# Altium PCB Power_vac.PcbDoc (part 2 of 5)
Units mm, origin at the board's own origin, x right, y up, seen from the top; angles counter-clockwise.
Board outline 180 x 212 mm, 4 copper layers (Top Layer, Int1 (GND), Int2 (PWR), Bottom Layer), stack 2.01 mm thick; 296 components, 149 nets, 798 pads, 522 vias.
Unrouted connection lines stored in the file: 1.
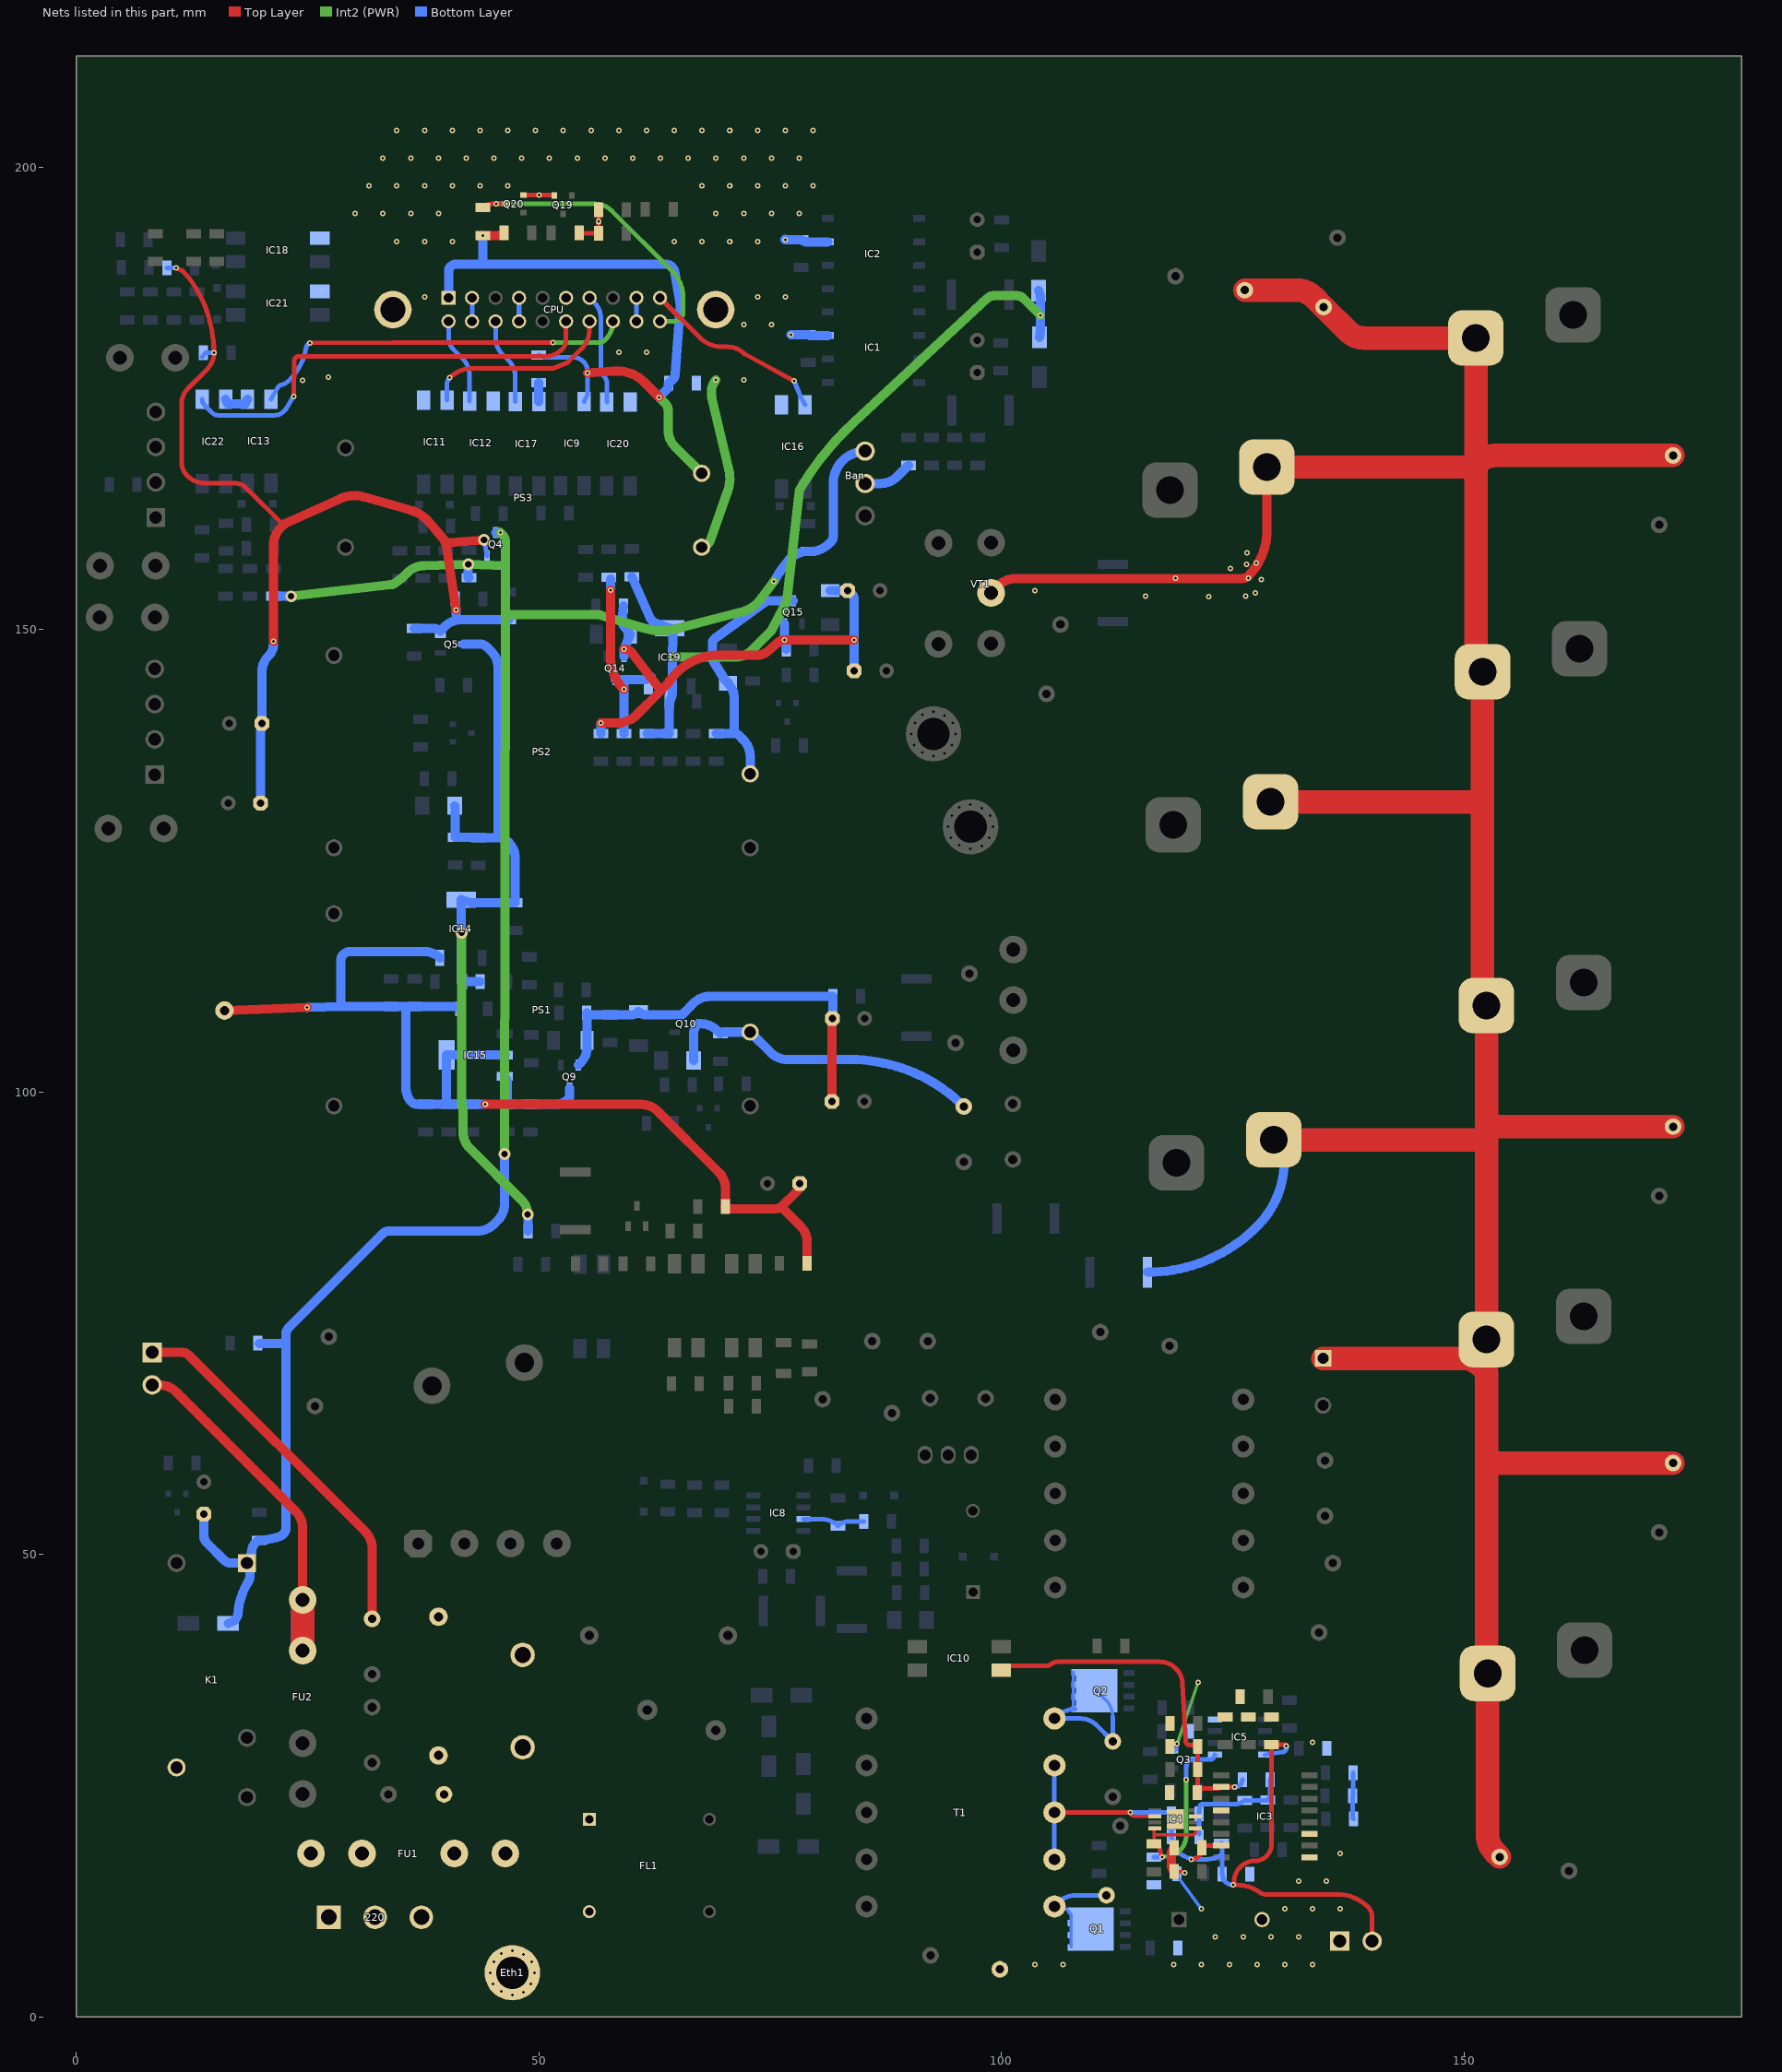
[diagram p4: the nets of this part, all layers, seen from the top]

## Footprints (in the part's own frame and the unit in brackets; to place one, negate y for a bottom-side part, rotate by r counter-clockwise, add the part's x,y. Pads: shape width x height; smd on the part's side, far side on the other; paste and mask are expansions set on the pad) (continued)
SOP65P490X110-9N [mm]
  rect 1.4x0.45 smd: 1(-2.2,0.975) 2(-2.2,0.325) 3(-2.2,-0.325) 4(-2.2,-0.975) 5(2.2,-0.975) 6(2.2,-0.325) 7(2.2,0.325) 8(2.2,0.975)
  rect 1.846x2.15 smd: 9(0,0)
  silkscreen extent -2.9,1.55 -1.5,1.55, body extent -2.45,-1.5 2.45,1.5, height 1.1
SOP254P1016X460-4N [mm]
  rect 2.1x1.45 smd: 1(-4.55,1.27) 2(-4.55,-1.27) 3(4.55,-1.27) 4(4.55,1.27)
  silkscreen extent -5.6,-2.3 3.15,2.34, body extent -5.08,-2.3 5.08,2.3, height 4.6
SOP254P1030X508-8N [mm]
  rect 1.3x0.75 smd: 1(-4.95,3.81) 2(-4.95,1.27) 3(-4.95,-1.27) 4(-4.95,-3.81) 5(4.95,-3.81) 6(4.95,-1.27) 7(4.95,1.27) 8(4.95,3.81)
  silkscreen extent -5.6,-4.83 3.95,4.83, body extent -5.15,-4.83 5.15,4.83, height 5.08
SOT95P230X110-3N [mm]
  rect 1.05x0.6 smd: 1(-1.1,0.95) 2(-1.1,-0.95) 3(1.1,0)
  silkscreen extent -1.63,-1.45 0.23,1.5, body extent -1.2,-1.45 1.2,1.45, height 0.95
SOT95P280X125-3N [mm]
  rect 1.2x0.6 smd: 1(-1.25,0.95) 2(-1.25,-0.95) 3(1.25,0)
  silkscreen extent -1.85,-1.48 0.3,1.5, body extent -1.4,-1.48 1.4,1.48, height 1.25
SOT230P700X180-4N [mm]
  rect 1.75x0.95 smd: 1(-3.15,2.3) 2(-3.15,0) 3(-3.15,-2.3)
  rect 1.75x3.2 smd: 4(3.15,0)
  silkscreen extent -4.03,-3.25 1.75,3.25, body extent -3.5,-3.25 3.5,3.25, height 1.8
THT_D_6mm_1#1 [mm]
  round 1.8 hole 1: 1(0,0) 2(6,0)
  silkscreen extent 1.5,-2 4.5,2
THT_D_6mm_1#2 [mm]
  round 3 hole 1.5: 1(0,0) 2(6,0)
  silkscreen extent 1.5,-2 4.5,2
THT_R_6mm_1 [mm]
  round 1.8 hole 0.9: 1(0,0) 2(6,0)
  silkscreen extent -2,-2 7.27,2
TO220 [mm]
  oval 1.6x2 hole 1.2: 1(-2.5,0) 2(0,0) 3(2.5,0)
  silkscreen extent -5.15,-1.95 5.25,2.8, body extent -5,-1.8 5.2,2.7, height 22.06
TO247 [mm] "3-Lead Plastic TO-247"
  round 3 hole 1.5: 1(-5.45,0) 2(0,0) 3(5.45,0)
  round 0.5 on Mech1: ""(-7.4,-2.3)
  silkscreen extent -8.1,-2.9 8.1,2.5, body extent -7.95,-2.75 7.95,2.35, height 26.95
TO247(D) [mm] "3-Lead Plastic TO-247"
  round 3 hole 1.5: 1(5.45,0) 2(-5.45,0)
  round 0.5 on Top Overlay: ""(-8.4,-2.3)
  round 0.5 on Mech1: ""(-7.5,-2.1)
  silkscreen extent -7.9,-2.5 8,2.8, body extent -7.95,-2.5 7.95,2.81, height 30.5
TO508P467X1023X1923-2P [mm]
  rect 1.8x1.8 hole 1.2: 1(0,0)
  round 1.8 hole 1.2: 2(5.08,0)
  silkscreen extent -2.64,-1.69 7.72,2.98, body extent -2.58,-1.69 7.66,2.98, height 19.23
UU105Y10MH [mm]
  rect 1.4x1.4 hole 0.9: 1(0,0)
  round 1.4 hole 0.9: 2(0,-10) 3(13,-10) 4(13,0)
  silkscreen extent -3.8,-12.5 16.25,7, body extent -3.25,-12.5 16.25,7, height 17.1
WJ2EDGR503P [mm]
  rect 2.55x2.55 hole 1.7: 1(0,0)
  round 2.55 hole 1.7: 2(5,0) 3(10,0)
  silkscreen extent -2.5,-10.7 12.5,2.1, body extent -2.5,-10.7 12.5,1.5, height 8.5

## Part data
220: "Connector", Manufacturer_Name="Ningbo Kangnex", Datasheet Link=https://datasheet.lcsc.com/lcsc/1912251636_Ningbo-Kangnex-Elec-WJ2EDGR-5-0-3P_C8480.pdf, Height=8.4mm, Manufacturer_Part_Number=WJ2EDGR-5.0-3P
+310_bridge Eth1 fod3184_+18v gnd_bridge: library part Connector_single_power, CommentText="\"Разъем\"", TypeConnector="Power connector", ValueManufacturerPartNumber="Power connector, *, *"
Ban: library part Connector_terminal_3pin, CurrentMax=10A, Manufacturer=Degson, PartNumber=DG350-3.5-03P-14, VoltageMax=300VAC, CommentText="\"Разъем\"", HelpURL=https://www.chipdip.ru/product/dg350-3.5-03p-12, Multichannel=3pin, Pitch=3.5mm, TypeConnector="Terminal connector", ValueManufacturerPartNumber="Terminal connector, 3pin, 3.5mm, 300VAC, 10A"
Buster_1 rele220_out: "Connector", Manufacturer_Name=Degson, Datasheet Link=https://www.tme.eu/Document/c7e2facf434c6541c93efde757aaf5e6/607.pdf, Height=7mm, Manufacturer_Part_Number=15EDGRC-3.5-02P-13-00AH
C1 C2 C3 C4 C5 C6 C7 C8 C50: library part Aluminium, Manufacturer=Wurth, Package="14x10x5 mm", PartNumber=860080475013, Temperature=-55...+105°C, Tolerance=±20%, TypeCapacitor="Aluminium capacitor", Voltage=450V, HelpURL=https://www.digikey.com/product-detail/en/wurth-electronics-inc/860080475013/732-9029-1-ND/5728972, Impedance=54mOhm
  C1 C2 C3 C4 C5 C6 C7 C8: ValueManufacturerPartNumber="Aluminium capacitor, 680μF, 450V, ±20%, 54mOhm, 14x10x5 mm, -55...+105°C"
  C50: ValueManufacturerPartNumber="Aluminium capacitor, 330μF, 450V, ±20%, 54mOhm, 14x10x5 mm, -55...+105°C"
C9 C10 C11 C12 C13 C14 C93: library part Film, Manufacturer=Epcos, Package="31.5x15 mm", PartNumber=B32774D4106K000, Temperature=-40...+105°C, Tolerance=±10%, TypeCapacitor="Film capacitor", Voltage=2kV, HelpURL=https://www.digikey.com/products/en/capacitors/film-capacitors/62?k=&pkeyword=&sv=0&pv2097=1958&sf=0&FV=fffc01ef%2C1f140000%2Cffe0003e%2Cffec6366&quantity=1&ColumnSort=1000011&page=1&stock=1&pageSize=25, Impedance=10.9mOhm
  C9 C10 C11 C12 C13 C14: ValueManufacturerPartNumber="Film capacitor, 1n, 2kV, ±10%, 10.9mOhm, 31.5x15 mm, -40...+105°C"
  C93: ValueManufacturerPartNumber="Film capacitor, 15p, 2kV, ±10%, 10.9mOhm, 31.5x15 mm, -40...+105°C"
C15 C18 C21 C23 C24 C25 C26 C27 C28 C29 C30 C31 C32 C33 C34 C35 C36 C37 C38 C39 C44 C45 C46 C47 C52 C53 C56 C57 C58 C59 C60 C61 C62 C63 C64 C65 C66 C67 C70 C71 C72 C73 C74 C75 C76 C79 C80 C81 C82 C83 C85 C86 C87 C88 C89 C91 C94 C95 C96 C97 C98 C99 C100 C101: library part Ceramic_1206, Manufacturer=Yageo, Package=1206, PartNumber=CC1206KRX7R9BB104, Temperature=-55...+125°C, Tolerance=±10%, TypeCapacitor="Ceramic capacitor", TypeDielectric=X7R, Voltage=50V, HelpURL=https://www.digikey.com/product-detail/en/yageo/CC1206KRX7R9BB104/311-1179-1-ND/303089
  C15 C45 C56 C60 C63 C67 C72 C76 C83 C85 C86 C91 C94 C95 C96 C97 C98 C99 C100 C101: ValueManufacturerPartNumber="Ceramic capacitor, 100n, X7R, ±10%, 50V, 1206, -55...+125°C"
  C18 C21 C24 C30 C31: ValueManufacturerPartNumber="Ceramic capacitor, 1μF, X7R, ±10%, 50V, 1206, -55...+125°C"
  C23 C44 C88: ValueManufacturerPartNumber="Ceramic capacitor, 2.2n, X7R, ±10%, 50V, 1206, -55...+125°C"
  C25 C27 C29 C33 C34 C36 C37 C52 C53 C61 C62 C70 C71 C79 C80 C81 C82: ValueManufacturerPartNumber="Ceramic capacitor, 0.1μF, X7R, ±10%, 50V, 1206, -55...+125°C"
  C26 C35 C57 C58 C59 C64 C65 C66 C73 C74 C75: ValueManufacturerPartNumber="Ceramic capacitor, 100μF, X7R, ±10%, 50V, 1206, -55...+125°C"
  C28 C38 C47: ValueManufacturerPartNumber="Ceramic capacitor, 1n, X7R, ±10%, 50V, 1206, -55...+125°C"
  C32: ValueManufacturerPartNumber="Ceramic capacitor, 2.2μF, X7R, ±10%, 50V, 1206, -55...+125°C"
  C39: ValueManufacturerPartNumber="Ceramic capacitor, 10n, X7R, ±10%, 50V, 1206, -55...+125°C"
  C46: ValueManufacturerPartNumber="Ceramic capacitor, 220n, X7R, ±10%, 50V, 1206, -55...+125°C"
  C87: ValueManufacturerPartNumber="Ceramic capacitor, 4.7u, X7R, ±10%, 50V, 1206, -55...+125°C"
  C89: ValueManufacturerPartNumber="Ceramic capacitor, 470p, X7R, ±10%, 50V, 1206, -55...+125°C"
C16: library part Ceramic_1206, Manufacturer=Yageo, Package=1206, PartNumber=CC1206KRX7R9BB104, Temperature=-55...+125°C, Tolerance=±10%, TypeCapacitor="Ceramic capacitor", TypeDielectric=X7R, Voltage=10v, HelpURL=https://www.digikey.com/product-detail/en/yageo/CC1206KRX7R9BB104/311-1179-1-ND/303089, ValueManufacturerPartNumber="Ceramic capacitor, 60u, X7R, ±10%, 10v, 1206, -55...+125°C"
C17 C20 C54 C55 C68 C69 C77 C78: library part Aluminium, Manufacturer=Wurth, Package="14x10x5 mm", PartNumber=860080475013, Temperature=-55...+105°C, Tolerance=±20%, TypeCapacitor="Aluminium capacitor", Voltage=25V, HelpURL=https://www.digikey.com/product-detail/en/wurth-electronics-inc/860080475013/732-9029-1-ND/5728972, Impedance=54mOhm
  C17 C20: ValueManufacturerPartNumber="Aluminium capacitor, 100u, 25V, ±20%, 54mOhm, 14x10x5 mm, -55...+105°C"
  C54 C55 C68 C69 C77 C78: ValueManufacturerPartNumber="Aluminium capacitor, 470μF, 25V, ±20%, 54mOhm, 14x10x5 mm, -55...+105°C"
C19 C22: library part Film, Manufacturer=Epcos, Package="31.5x15 mm", PartNumber=B32774D4106K000, Temperature=-40...+105°C, Tolerance=±10%, TypeCapacitor="Film capacitor", Voltage=2kv, HelpURL=https://www.digikey.com/products/en/capacitors/film-capacitors/62?k=&pkeyword=&sv=0&pv2097=1958&sf=0&FV=fffc01ef%2C1f140000%2Cffe0003e%2Cffec6366&quantity=1&ColumnSort=1000011&page=1&stock=1&pageSize=25, Impedance=10.9mOhm, ValueManufacturerPartNumber="Film capacitor, 1n, 2kv, ±10%, 10.9mOhm, 31.5x15 mm, -40...+105°C"
C40 C41 C51 C90 C92: library part Film, Manufacturer=Epcos, Package="31.5x15 mm", PartNumber=B32774D4106K000, Temperature=-40...+105°C, Tolerance=±10%, TypeCapacitor="Film capacitor", Voltage=450VDC, HelpURL=https://www.digikey.com/products/en/capacitors/film-capacitors/62?k=&pkeyword=&sv=0&pv2097=1958&sf=0&FV=fffc01ef%2C1f140000%2Cffe0003e%2Cffec6366&quantity=1&ColumnSort=1000011&page=1&stock=1&pageSize=25, Impedance=10.9mOhm
  C40: ValueManufacturerPartNumber="Film capacitor, 1n, 450VDC, ±10%, 10.9mOhm, 31.5x15 mm, -40...+105°C"
  C41: ValueManufacturerPartNumber="Film capacitor, 10n, 450VDC, ±10%, 10.9mOhm, 31.5x15 mm, -40...+105°C"
  C51: ValueManufacturerPartNumber="Film capacitor, 2.2n 1kv, 450VDC, ±10%, 10.9mOhm, 31.5x15 mm, -40...+105°C"
  C90 C92: ValueManufacturerPartNumber="Film capacitor, 2.2n, 450VDC, ±10%, 10.9mOhm, 31.5x15 mm, -40...+105°C"
C42: library part Aluminium, Manufacturer=Wurth, Package="14x10x5 mm", PartNumber=860080475013, Temperature=-55...+105°C, Tolerance=±20%, TypeCapacitor="Aluminium capacitor", Voltage=10v, HelpURL=https://www.digikey.com/product-detail/en/wurth-electronics-inc/860080475013/732-9029-1-ND/5728972, Impedance=54mOhm, ValueManufacturerPartNumber="Aluminium capacitor, 100μF, 10v, ±20%, 54mOhm, 14x10x5 mm, -55...+105°C"
C43: library part Aluminium, Manufacturer=Wurth, Package="14x10x5 mm", PartNumber=860080475013, Temperature=-55...+105°C, Tolerance=±20%, TypeCapacitor="Aluminium capacitor", Voltage=50v, HelpURL=https://www.digikey.com/product-detail/en/wurth-electronics-inc/860080475013/732-9029-1-ND/5728972, Impedance=54mOhm, ValueManufacturerPartNumber="Aluminium capacitor, 100μF, 50v, ±20%, 54mOhm, 14x10x5 mm, -55...+105°C"
C48 C49: library part Film, Manufacturer=Epcos, Package="31.5x15 mm", PartNumber=B32774D4106K000, Temperature=-40...+105°C, Tolerance=±10%, TypeCapacitor="Film capacitor", Voltage=310V, HelpURL=https://www.digikey.com/products/en/capacitors/film-capacitors/62?k=&pkeyword=&sv=0&pv2097=1958&sf=0&FV=fffc01ef%2C1f140000%2Cffe0003e%2Cffec6366&quantity=1&ColumnSort=1000011&page=1&stock=1&pageSize=25, Impedance=10.9mOhm, ValueManufacturerPartNumber="Film capacitor, 0.47, 310V, ±10%, 10.9mOhm, 31.5x15 mm, -40...+105°C"
C84: library part Aluminium, Manufacturer=Wurth, Package="14x10x5 mm", PartNumber=860080475013, Temperature=-55...+105°C, Tolerance=±20%, TypeCapacitor="Aluminium capacitor", Voltage=25v, HelpURL=https://www.digikey.com/product-detail/en/wurth-electronics-inc/860080475013/732-9029-1-ND/5728972, Impedance=54mOhm, ValueManufacturerPartNumber="Aluminium capacitor, 100μF, 25v, ±20%, 54mOhm, 14x10x5 mm, -55...+105°C"
CPU: "Connector", Manufacturer_Name=Connfly, Datasheet Link=https://www.tme.com/Document/a911e76bcf9b13f23ffda9abd299f5e3/DS1011.pdf, Height=8.7mm, Manufacturer_Part_Number=DS1011-20RBSIB7
D1 D2 D4 D5 D6 D7 D8: "Diode", Manufacturer_Name="SMC Diode Solutions", Datasheet Link=http://www.smc-diodes.com/propdf/ES1(A-M)%20N0159%20REV.E.pdf, Height=2.95mm, Manufacturer_Part_Number=ES1JTR
D3 D10 D13 D17 D22 D23 D24: library part THT_D_6mm_1
D9: "Diode", Manufacturer_Name=onsemi, Mouser Part Number=512-RHRP8120, Arrow Part Number=RHRP8120, Arrow Price/Stock=https://www.arrow.com/en/products/rhrp8120/on-semiconductor, Datasheet Link=https://www.onsemi.com/pub/Collateral/RHRP8120-D.PDF, Height=4.672mm, Manufacturer_Part_Number=RHRP8120, Mouser Price/Stock=https://www.mouser.co.uk/ProductDetail/onsemi-Fairchild/RHRP8120?qs=UeXq8qLVREGknIOnwE%2FlEA%3D%3D
D11 D12 D14 D16 D18 D19 D20 D21: "Diode", Manufacturer_Name=Vishay, Mouser Part Number=625-1N4148W-V, Arrow Part Number=1N4148W-V-GS08, Arrow Price/Stock=https://www.arrow.com/en/products/1n4148w-v-gs08/vishay, Datasheet Link=https://us.rs-online.com/m/d/a2789c8794cb0c42ced29f2dd8571f3c.pdf, Height=1.35mm, Manufacturer_Part_Number=1N4148W-V-GS08, Mouser Price/Stock=https://www.mouser.co.uk/ProductDetail/Vishay-Semiconductors/1N4148W-V-GS08?qs=TNTIDjy6APrS%2Fdgq1RSs3A%3D%3D
D15: "Diode", Manufacturer_Name=Nexperia, Datasheet Link=https://assets.nexperia.com/documents/data-sheet/BZV55_SER.pdf, Height=1.6mm, Manufacturer_Part_Number=BZV55B3V3
FL1: "Filter", Manufacturer_Name="FH(Guangdong Fenghua Advanced Tech)", Datasheet Link=https://datasheet.lcsc.com/lcsc/2304140030_FH--Guangdong-Fenghua-Advanced-Tech-UU10-5Y-10mH_C75196.pdf, Height=17mm, Manufacturer_Part_Number=UU10.5Y-10MH
FU1 FU2: library part Fuse, Manufacturer=Littelfuse, MaxCurrent=3A, Package=5x20mm, PartNumber=01110501Z, VoltageMax=250VAC, HelpURL=https://www.digikey.com/products/en?keywords=01110501Z, TypeFuse="Electromechanics relay", ValueManufacturerPartNumber="Electromechanics relay, 250VAC, 3A, 5x20mm,"
IC1 IC2: "Integrated Circuit", Manufacturer_Name=onsemi, Mouser Part Number=512-FOD3184SDV, Arrow Part Number=FOD3184SDV, Arrow Price/Stock=https://www.arrow.com/en/products/fod3184sdv/on-semiconductor?region=nac, Datasheet Link=https://www.arrow.com/en/products/fod3184sdv/on-semiconductor, Height=5.08mm, Manufacturer_Part_Number=FOD3184SDV, Mouser Price/Stock=https://www.mouser.co.uk/ProductDetail/onsemi-Fairchild/FOD3184SDV?qs=GCVmsggAYMRSO6%252BIR7fWEw%3D%3D
IC3: "Integrated Circuit", Manufacturer_Name=onsemi, Mouser Part Number=N/A, Datasheet Link=https://www.onsemi.com/pub/Collateral/SG3525A-D.PDF, Height=2.65mm, Manufacturer_Part_Number=SG3525A, Mouser Price/Stock=https://www.mouser.co.uk/ProductDetail/onsemi/SG3525A?qs=%252BEew9%252B0nqrDSSy3t2TCw8g%3D%3D
IC4: "Integrated Circuit", Manufacturer_Name="Texas Instruments", Mouser Part Number=595-CC27524A1QDGNRQ1, Arrow Part Number=UCC27524A1QDGNRQ1, Arrow Price/Stock=https://www.arrow.com/en/products/ucc27524a1qdgnrq1/texas-instruments.html?utm_currency=USD&region=nac, Datasheet Link=http://www.ti.com/lit/gpn/ucc27524a1-q1, Height=1.1mm, Manufacturer_Part_Number=UCC27524A1QDGNRQ1, Mouser Price/Stock=https://www.mouser.co.uk/ProductDetail/Texas-Instruments/UCC27524A1QDGNRQ1?qs=5aG0NVq1C4zKCNInVyVkfw%3D%3D
IC5: "Integrated Circuit", Manufacturer_Name="Texas Instruments", Mouser Part Number=595-LM2903DR, Arrow Part Number=LM2903DR, Arrow Price/Stock=https://www.arrow.com/en/products/lm2903dr/texas-instruments?region=nac, Datasheet Link=http://www.ti.com/lit/ds/symlink/lm393.pdf, Height=1.75mm, Manufacturer_Part_Number=LM2903DR, Mouser Price/Stock=https://www.mouser.co.uk/ProductDetail/Texas-Instruments/LM2903DR?qs=6aLkNDRfRUZTZwd6enMTiA%3D%3D
IC6 IC9 IC10 IC11 IC12 IC13 IC16 IC17 IC18 IC20 IC21 IC22 IC23 IC24: "Integrated Circuit", Manufacturer_Name=Lite-On, Arrow Part Number=LTV817S, Arrow Price/Stock=https://www.arrow.com/en/products/ltv-817s/lite-on-technology, Datasheet Link=https://www.arrow.com/en/products/ltv-817s/lite-on-technology, Height=4.6mm, Manufacturer_Part_Number=LTV817S
IC7: "Integrated Circuit", Manufacturer_Name=Nexperia, Mouser Part Number=771-TL431MFDT215, Arrow Part Number=TL431MFDT,215, Arrow Price/Stock=https://www.arrow.com/en/products/tl431mfdt215/nexperia?utm_currency=USD&region=nac, Datasheet Link=https://assets.nexperia.com/documents/data-sheet/TL431_FAM.pdf, Height=1.1mm, Manufacturer_Part_Number=TL431MFDT,215, Mouser Price/Stock=https://www.mouser.co.uk/ProductDetail/Nexperia/TL431MFDT215?qs=A1cBxND5mHKvFzVl3lBdcQ%3D%3D
IC8: "Integrated Circuit", Manufacturer_Name=STMicroelectronics, Mouser Part Number=511-L6565D, Arrow Part Number=L6565D, Arrow Price/Stock=https://www.arrow.com/en/products/l6565d/stmicroelectronics, Datasheet Link=https://www.st.com/resource/en/datasheet/l6565.pdf, Height=1.75mm, Manufacturer_Part_Number=L6565D, Mouser Price/Stock=https://www.mouser.co.uk/ProductDetail/STMicroelectronics/L6565D/?qs=sps7W%2FwBcGGH47tz0cin9g%3D%3D
IC14 IC15 IC19: "Integrated Circuit", Manufacturer_Name="Changjiang Electronics Tech (CJ)", Manufacturer_Part_Number=LM317(SOT-223), Datasheet Link=https://www.jscj-elec.com/gallery//file/LM317%20SOT-223%20%20V2.0.pdf, Height=1.8mm
K1: library part HF118F_005-1ZS1T_136_, "Relay or Contactor", Manufacturer_Name=Hongfa, Manufacturer_Part_Number=HF118F/005-1ZS1T(136), Height=12.8mm
on-off1 switch_vak1: "Connector", Manufacturer_Name=Degson, Manufacturer_Part_Number=15EDGRC-3.81-04P-14-00A(H), Datasheet Link=https://datasheet.octopart.com/15EDGRC-3.81-04P-14-00A%28H%29-Degson-datasheet-17801160.pdf, Height=7.54mm
PS1 PS2: "Power Supply", Manufacturer_Name="Mean Well", Mouser Part Number=709-IRM15-24, Arrow Part Number=IRM-15-24, Arrow Price/Stock=https://www.arrow.com/en/products/irm-15-24/mean-well-enterprises?utm_currency=USD&region=europe, Datasheet Link=https://componentsearchengine.com/Datasheets/2/IRM-15-24.pdf, Manufacturer_Part_Number=IRM-15-24, Mouser Price/Stock=https://www.mouser.co.uk/ProductDetail/MEAN-WELL/IRM-15-24?qs=WkdRfq4wf1PZSEWhZtKDbQ%3D%3D
PS3: "Power Supply", Manufacturer_Name="Mean Well", Mouser Part Number=709-IRM10-3.3, Arrow Part Number=IRM-10-3.3, Arrow Price/Stock=https://www.arrow.com/en/products/irm-10-3.3/mean-well-enterprises?region=nac, Datasheet Link=https://datasheet.datasheetarchive.com/originals/distributors/DKDS-14/277831.pdf, Height=21.5mm, Manufacturer_Part_Number=IRM-10-3.3, Mouser Price/Stock=https://www.mouser.co.uk/ProductDetail/MEAN-WELL/IRM-10-3.3?qs=WkdRfq4wf1M%252Ba4IjD903Hw%3D%3D
Q1 Q2: "MOSFET (N-Channel)", Manufacturer_Name=Infineon, Mouser Part Number=726-BSC123N08NS3GATM, Arrow Part Number=BSC123N08NS3GATMA1, Arrow Price/Stock=https://www.arrow.com/en/products/bsc123n08ns3gatma1/infineon-technologies-ag.html?utm_currency=USD&region=asia, Datasheet Link=https://www.infineon.com/dgdl/Infineon-BSC123N08NS3G-DS-v02_05-en.pdf?fileId=db3a30431add1d95011ae80eb8555625, Manufacturer_Part_Number=BSC123N08NS3GATMA1, Mouser Price/Stock=https://www.mouser.co.uk/ProductDetail/Infineon-Technologies/BSC123N08NS3GATMA1?qs=K00xGehIljtQ0xUH5qROpA%3D%3D
Q3 Q7 Q12 Q16 Q18: "Transistor BJT NPN", Manufacturer_Name=Nexperia, Mouser Part Number=771-BC817-25-T/R, Arrow Part Number=BC817-25,215, Arrow Price/Stock=https://www.arrow.com/en/products/bc817-25215/nexperia?region=nac, Datasheet Link=https://assets.nexperia.com/documents/data-sheet/BC817_SER.pdf, Height=1.1mm, Manufacturer_Part_Number=BC817-25,215, Mouser Price/Stock=https://www.mouser.co.uk/ProductDetail/Nexperia/BC817-25215?qs=me8TqzrmIYUj67JkTBzlfg%3D%3D
Q4 Q5 Q9 Q10 Q14 Q15: library part AO3401A, "MOSFET (P-Channel)", Manufacturer_Name="Alpha & Omega Semiconductors", Arrow Part Number=AO3401A, Arrow Price/Stock=https://www.arrow.com/en/products/ao3401a/alpha-and-omega-semiconductor?utm_currency=USD&region=nac, Datasheet Link=http://www.aosmd.com/pdfs/datasheet/AO3401A.pdf, Height=1.25mm, Manufacturer_Part_Number=AO3401A
Q19 Q20: library part BC817-25,215_1, "Transistor BJT NPN", Manufacturer_Name=Nexperia, Mouser Part Number=771-BC817-25-T/R, Arrow Part Number=BC817-25,215, Arrow Price/Stock=https://www.arrow.com/en/products/bc817-25215/nexperia?region=nac, Datasheet Link=https://assets.nexperia.com/documents/data-sheet/BC817_SER.pdf, Height=1.1mm, Manufacturer_Part_Number=BC817-25,215, Mouser Price/Stock=https://www.mouser.co.uk/ProductDetail/Nexperia/BC817-25215?qs=me8TqzrmIYUj67JkTBzlfg%3D%3D
R1 R3 R5 R7: library part Resistor_2512, Manufacturer=Yageo, Package=2512, PartNumber=RC2512JK-07100RL, Power=1W, Temperature=-55...+125°C, Tolerance=±5%, TypeResistor="Resistor film", HelpURL=https://www.digikey.com/product-detail/en/yageo/RC2512JK-07100RL/YAG3393CT-ND/5962215
  R1 R5: ValueManufacturerPartNumber="Resistor film, 15, ±5%, 2512, 1W, -55...+125°C"
  R3 R7: ValueManufacturerPartNumber="Resistor film, 1k, ±5%, 2512, 1W, -55...+125°C"
R2 R6 R8 R9 R10 R11 R12 R14 R15 R16 R17 R18 R19 R20 R21 R22 R23 R24 R29 R30 R31 R32 R34 R35 R37 R38 R39 R40 R44 R47 R48 R49 R50 R51 R52 R53 R54 R55 R56 R57 R58 R59 R60 R61 R62 R63 R64 R65 R66 R67 R68 R69 R70 R71 R72 R73 R74 R75 R76 R77 R78 R79 R80 R81 R82 R83 R84 R85 R86 R87 R88 R89 R90 R91 R92 R93 R94 R95 R97 R98: library part Resistor_1206, Manufacturer=Yageo, Package=1206, PartNumber=RC1206JR-07100RL, Power=0.25W, Temperature=-55...+125°C, Tolerance=±5%, TypeResistor="Resistor film", HelpURL=https://www.digikey.com/product-detail/en/yageo/RC1206JR-07100RL/311-100ERCT-ND/732153
  R2 R6 R23 R32 R44 R52 R86 R91 R97: ValueManufacturerPartNumber="Resistor film, 1k, ±5%, 1206, 0.25W, -55...+125°C"
  R8 R10 R11 R16 R18 R22 R24 R39 R49 R53 R54 R60 R66 R67 R70 R71 R75 R78 R81 R83 R84 R87 R92 R93 R94 R98: ValueManufacturerPartNumber="Resistor film, 10k, ±5%, 1206, 0.25W, -55...+125°C"
  R9 R12 R14 R38: ValueManufacturerPartNumber="Resistor film, 10, ±5%, 1206, 0.25W, -55...+125°C"
  R15 R31: ValueManufacturerPartNumber="Resistor film, 47, ±5%, 1206, 0.25W, -55...+125°C"
  R17: ValueManufacturerPartNumber="Resistor film, 6.8k, ±5%, 1206, 0.25W, -55...+125°C"
  R19: ValueManufacturerPartNumber="Resistor film, 22k, ±5%, 1206, 0.25W, -55...+125°C"
  R20: ValueManufacturerPartNumber="Resistor film, 30k, ±5%, 1206, 0.25W, -55...+125°C"
  R21: ValueManufacturerPartNumber="Resistor film, 100, ±5%, 1206, 0.25W, -55...+125°C"
  R29: ValueManufacturerPartNumber="Resistor film, 47k, ±5%, 1206, 0.25W, -55...+125°C"
  R30 R89: ValueManufacturerPartNumber="Resistor film, 1.2k, ±5%, 1206, 0.25W, -55...+125°C"
  R34: ValueManufacturerPartNumber="Resistor film, 220k, ±5%, 1206, 0.25W, -55...+125°C"
  R35: ValueManufacturerPartNumber="Resistor film, 100R, ±5%, 1206, 0.25W, -55...+125°C"
  R37: ValueManufacturerPartNumber="Resistor film, 3M, ±5%, 1206, 0.25W, -55...+125°C"
  R40: ValueManufacturerPartNumber="Resistor film, 16k, ±5%, 1206, 0.25W, -55...+125°C"
  R47 R50 R65 R68 R77 R79 R95: ValueManufacturerPartNumber="Resistor film, 100k, ±5%, 1206, 0.25W, -55...+125°C"
  R48 R56 R63 R72 R82: ValueManufacturerPartNumber="Resistor film, 470, ±5%, 1206, 0.25W, -55...+125°C"
  R51 R69 R80: ValueManufacturerPartNumber="Resistor film, 2k, ±5%, 1206, 0.25W, -55...+125°C"
  R55 R59 R64 R76 R85: ValueManufacturerPartNumber="Resistor film, 620, ±5%, 1206, 0.25W, -55...+125°C"
  R57 R61 R73: ValueManufacturerPartNumber="Resistor film, 3.3k, ±5%, 1206, 0.25W, -55...+125°C"
  R58 R62 R74: ValueManufacturerPartNumber="Resistor film, 240, ±5%, 1206, 0.25W, -55...+125°C"
  R88 R90: ValueManufacturerPartNumber="Resistor film, 4.7k, ±5%, 1206, 0.25W, -55...+125°C"
R4 R25 R26 R43 R45 R96: library part THT_R_6mm_1
R13: library part BPR58CR10J, "No Description Available", Manufacturer_Name="KOA Speer", Copyright="Copyright (C) 2026 Ultra Librarian. All rights reserved.", Manufacturer_Part_Number=BPR58CR10J, Type="Through Hole Resistors"
R27 R28 R33 R36 R41: library part Resistor_2512, Manufacturer=Yageo, Package=2512, PartNumber=RC2512JK-07100RL, Power=1W, Temperature=-55...+125°C, TypeResistor="Resistor film", HelpURL=https://www.digikey.com/product-detail/en/yageo/RC2512JK-07100RL/YAG3393CT-ND/5962215, Tolerance=2512
  R27 R28: ValueManufacturerPartNumber="Resistor film, 75k, 2512, 2512, 1W, -55...+125°C"
  R33 R36: ValueManufacturerPartNumber="Resistor film, 150k, 2512, 2512, 1W, -55...+125°C"
  R41: ValueManufacturerPartNumber="Resistor film, 2.43k, 2512, 2512, 1W, -55...+125°C"
R42: library part BPR58CR10J, "Resistor", Manufacturer_Name="KOA Speer", Mouser Part Number=660-BPR58CR10J, Arrow Part Number=BPR58CR10J, Arrow Price/Stock=https://www.arrow.com/en/products/bpr58cr10j/koa-speer-electronics.html?utm_currency=USD&region=nac, Datasheet Link=https://www.koaspeer.com/catimages/Products/BPR/BPR.pdf, Height=19mm, Manufacturer_Part_Number=BPR58CR10J, Mouser Price/Stock=https://www.mouser.co.uk/ProductDetail/KOA-Speer/BPR58CR10J?qs=c3C3yipULq1EyCkbnj3nTQ%3D%3D
R46: library part NTC, Manufacturer=Epcos, MaxCurrent=7A, Package="pitch 7.5mm", PartNumber=B57237S229M54, Temperature=-55...+125°C, Tolerance=±20%, TypeResistor="NTC resistor", HelpURL=https://www.digikey.com/product-detail/en/epcos-tdk/B57237S229M54/495-76635-1-ND/8126375, ValueManufacturerPartNumber="NTC resistor, NTC 10, ±20%, pitch 7.5mm, 7A, -55...+125°C"
RV1: "Varistor", Manufacturer_Name=Bourns, Mouser Part Number=652-MOV-20D431K, Arrow Part Number=MOV-20D431K, Arrow Price/Stock=https://www.arrow.com/en/products/mov-20d431k/bourns?utm_currency=USD&region=nac, Datasheet Link=https://www.bourns.com/data/global/pdfs/MOV20D.pdf, Height=26mm, Manufacturer_Part_Number=MOV-20D431K, Mouser Price/Stock=https://www.mouser.co.uk/ProductDetail/Bourns/MOV-20D431K?qs=CQ3B1E%252BbPs2R73OUL4kc5g%3D%3D
VD1: library part Diode_single, Current=150mA, Manufacturer="Micro Commercial", Package=SOD-323, PartNumber=HEA08, Temperature=-55...+150°C, Voltage=75V, VoltageDrop=1V, HelpURL=https://www.digikey.com/product-detail/en/micro-commercial-co/1N4148WX-TP/1N4148WXTPMSCT-ND/717312, RecoveryTime=4ns, TypeDiode="Single diode", ValueManufacturerPartNumber="Single diode, 75V, 150mA, 1V, 4ns, SOD-323, -55...+150°C"
VD2: library part "1PH rectifier", Current=2A, Manufacturer="Comchip Technology", Package=4-SMD, PartNumber=RS207, Temperature=-55...+150°C, Voltage=600V, VoltageDrop=1.1V, HelpURL=https://www.digikey.com/product-detail/en/comchip-technology/DF206ST-G/641-1425-1-ND/2208797, TypeDiode="Single phase rectifier", ValueManufacturerPartNumber="Single phase rectifier, 600V, 2A, 1.1V, 4-SMD, -55...+150°C"
VT1 VT2: library part IGBT, CurrentCE=40A, Manufacturer="Rohm Semiconductor", MaxPower=144W, Package=TO247, PartNumber=RGTH40TS65GC11, Temperature=-55...+125°C, VoltageCE=650V, VoltageSaturation=2.1V, GateCharge=40nC, HelpURL=https://www.digikey.com/product-detail/en/rohm-semiconductor/RGTH40TS65GC11/RGTH40TS65GC11-ND/5029953, TimeOnOff=22ns/73ns, TypeTransistor="IGBT transistor", ValueManufacturerPartNumber="IGBT transistor, 650V, 40A, 40nC, 144W, 2.1V, 22ns/73ns, TO247, -55...+125°C"
VT3: library part MOSFET_N_123, CurrentDS=7A, InputCapacitor=756pF, Manufacturer="Infineon Technologies", MaxPower=2.5W, Package=8-TDSON, PartNumber=STP7NB80FI, Temperature=-55...+150°C, VoltageDS=80V, GateCharge=9.1nC, HelpURL=https://www.digikey.com/product-detail/en/infineon-technologies/BSC340N08NS3GATMA1/BSC340N08NS3GATMA1TR-ND/2080655, RDS=34mOhm, TypeTransistor="MOSFET N-channel transistor", ValueManufacturerPartNumber="MOSFET N-channel transistor, 80V, 7A, 9.1nC, 2.5W, 34mOhm, 756pF, 8-TDSON, -55...+150°C"
Z1 Z8: library part BZV55C18, "Zener Diode", Manufacturer_Name=Microchip, Mouser Part Number=494-BZV55C18, Arrow Part Number=BZV55C18, Arrow Price/Stock=https://www.arrow.com/en/products/bzv55c18/microchip-technology.html?utm_currency=USD&region=nac, Datasheet Link=https://www.microsemi.com/document-portal/doc_download/8298-bzv55-c2v4-c75-datasheet, Height=1.7mm, Manufacturer_Part_Number=BZV55C18, Mouser Price/Stock=https://www.mouser.co.uk/ProductDetail/Microchip-Technology/BZV55C18?qs=w%2Fv1CP2dgqosS2q5rh%252BhPQ%3D%3D
Z2 Z3 Z4 Z5: "Zener Diode", Manufacturer_Name="Microsemi Corporation", Mouser Part Number=494-BZV55C15, Arrow Part Number=BZV55C15, Arrow Price/Stock=https://www.arrow.com/en/products/bzv55c15/microsemi, Datasheet Link=https://www.mouser.com/datasheet/2/268/BZV55_C2V4_C75-1593780.pdf, Manufacturer_Part_Number=BZV55C15, Mouser Price/Stock=https://www.mouser.co.uk/ProductDetail/Microchip-Microsemi/BZV55C15/?qs=TXMzd3F6Eykee5C9dglsnA%3D%3D
Z6 Z7: "Zener Diode", Manufacturer_Name=Microchip, Mouser Part Number=494-BZV55C18, Arrow Part Number=BZV55C18, Arrow Price/Stock=https://www.arrow.com/en/products/bzv55c18/microchip-technology.html?utm_currency=USD&region=nac, Datasheet Link=https://www.microsemi.com/document-portal/doc_download/8298-bzv55-c2v4-c75-datasheet, Height=1.7mm, Manufacturer_Part_Number=BZV55C18, Mouser Price/Stock=https://www.mouser.co.uk/ProductDetail/Microchip-Technology/BZV55C18?qs=w%2Fv1CP2dgqosS2q5rh%252BhPQ%3D%3D

## Via types
v1: diameter 0.6/0.6/0.6/0.6 (per signal layer), hole 0.3, Top Layer to Bottom Layer, tented both sides, 277 vias
v2: diameter 0.6, hole 0.3, Top Layer to Bottom Layer, tented both sides, 239 vias
v3: diameter 1.27, hole 0.711, Top Layer to Bottom Layer, 6 vias

## Nets (pads, with @x,y where several pads share a name; then routed paths per layer and width w, separated by ;. In a path a pad name is that pad's centre, name@x,y a point inside that pad or via, vN(x,y) a via of type N, cw(c..) or ccw(c..) an arc to the next point about the centre after c; other vN are vias at no path point)
3.3v_digit: C16.2 C85.2 CPU.1 IC9.4 PS3.3 R93.2 R94.2 | length 76.1
  Top Layer w1: v2(43.925,192.625) 45.561,192.625 ccw(c45.561,193.564) R93.2@46.225,192.9 ; v2(55.25,177.75) 57.895,177.947 cw(c57.969,176.95) 57.963,177.95 57.966,177.95 58.523,177.95 cw(c58.522,173.959) 61.344,176.781 61.347,176.778 v2@62.988,175.138
  Int2 (PWR) w1: v2(62.975,175.125) 63.658,174.442 cw(c62.95,173.736) 63.95,173.736 63.95,171.577 ccw(c66.49,171.577) 64.694,169.781 PS3.3@67.575,166.9
  Bottom Layer w0.5: C16.2@49.975,179.7 50.525,179.45 53.653,179.45 cw(c53.653,177.828) 54.8,178.975 cw(c53.714,177.889) 55.25,177.889 v2(55.25,177.75) 55.25,175.475 IC9.4@54.881,174.675
  Bottom Layer w1: CPU.1@40.22,185.875 40.22,188.975 cw(c41.114,188.527) 41.051,189.525 43.925,189.525 63.671,189.525 cw(c63.671,188.525) 64.594,188.91 cw(c63.671,188.525) 64.657,188.693 65.248,185.225 ; 43.925,189.646 v2(43.925,192.625) ; v2(62.975,175.125) 63.975,176.125 63.975,176.529 cw(c64.146,176.529) C85.2@64.025,176.65 64.393,176.969 ccw(c63.739,177.725) 64.736,177.652 65.26,184.986 ccw(c64.262,185.057) 65.262,185.057 ccw(c64.262,185.057) 65.248,185.224
12v: C53.2 C56.2 C57.2 C58.2 IC14.2 IC14.4 Q5.3 R58.2 R97.2 Z8.1 | length 91.5
  Int2 (PWR) w1: v3(41.625,117.2) 41.625,98.612 ccw(c42.137,98.612) 41.775,98.25 41.775,95.702 ccw(c44.315,95.702) 42.519,93.906 48.139,88.286 cw(c46.602,86.75) v3(48.775,86.75)
  Bottom Layer w1: Z8.1@40.875,130.95 cw(c40.695,130.77) 40.95,130.77 C53.2@40.95,127.55 43.329,127.55 cw(c43.329,127.379) C56.2@43.45,127.5 45.553,127.5 ; Q5.3@41.825,148.425 43.636,148.425 cw(c43.636,147.425) 44.342,148.133 44.88,147.595 cw(c43.255,145.97) 45.553,145.971 45.553,145.967 45.553,127.5 ; C57.2@43.626,111.925 41.6,111.925 41.6,114.44 ccw(c41.515,114.44) IC14.2@41.575,114.5 IC14.4@41.575,120.8 42.675,120.475 R58.2@47.425,120.475 47.425,125.275 ccw(c44.95,125.275) 46.7,127.025 ccw(c45.553,125.878) 45.553,127.5 ; v3(48.775,86.75) cw(c48.654,86.629) 48.825,86.629 R97.2@48.825,84.95
12v_akum: Buster_1.2 C26.1 C27.1 C29.1 C30.1 C37.1 IC3.15 IC4.6 IC5.8 R14.2 T1.2 T1.3 T1.4 | length 85.8
  Top Layer w0.35: v2(113.95,22.075) ccw(c114.351,22.075) 114.351,21.674 IC4.6@116.575,21.674
  Top Layer w0.5: T1.3@105.725,22.085 v2@113.95,22.085 ; v2(120.525,17.025) ccw(c120.525,18.175) 121.675,18.175 C26.1@121.675,18.275 cw(c121.9,18.275) 121.9,18.5 IC3.15@123.75,18.5 ; v2(130.8,29.25) ccw(c130.625,29.25) 130.625,29.425 C37.1@129.176,29.425 129.176,18.626 cw(c127.4,18.626) 127.4,16.85 ccw(c127.4,14.6) 125.15,14.6 125.15,14.561 cw(c124.65,14.563) v2(125.033,14.242) 125.15,14.242 125.457,14.242 cw(c125.456,10.04) 127.886,13.468 ccw(c128.65,14.549) 128.65,13.225 136.294,13.225 136.296,13.225 cw(c136.299,8.515) 139.63,11.845 cw(c138.556,10.771) 139.632,11.843 cw(c138.556,10.771) 140.075,10.77 Buster_1.2@140.075,8.175
  Bottom Layer w0.35: C30.1@118.345,19.858 ccw(c119.558,19.858) C30.1@118.7,19
  Bottom Layer w0.5: T1.2@105.725,17.005 T1.3@105.725,22.085 T1.4@105.725,27.165 ; v2(113.95,22.075) 118.127,22.075 C29.1@118.377,21.95 ; C30.1@118.345,19.449 118.556,18.94 118.572,18.899 118.956,17.974 ccw(c119.417,18.166) 119.096,17.783 ccw(c121.185,20.281) 121.185,17.025 122.262,17.025 ccw(c122.254,19.539) 122.264,17.025 ccw(c122.254,19.539) 123.775,17.537 ; C30.1@118.345,19.858 C29.1@118.345,21.95 ; R14.2@123.775,18.725 cw(c123.594,18.544) 123.85,18.544 C27.1@123.85,15.425 123.986,14.875 ccw(c125.033,15.425) v2(125.033,14.242) ; IC5.8@128.487,28.345 129,28.42 130.392,28.624 ccw(c130.318,29.118) v2(130.8,29.25)
12v_cher: C52.2 C54.1 C55.1 Q4.2 Q5.2 R47.1 R50.2 R72.2 R82.2 | length 116.5
  Top Layer w0.5: v2(10.75,189.1) 11.33,188.856 cw(c11.135,188.396) 11.496,188.742 cw(c3.247,180.86) 13.809,185.175 cw(c0.825,179.871) 14.85,179.936 v2(14.85,179.925) cw(c12.315,179.925) 14.108,178.133 12.025,176.05 ccw(c13.594,174.481) 11.375,174.481 11.375,168.028 ccw(c13.253,168.028) 11.925,166.7 12.031,166.594 ccw(c13.827,168.39) 13.827,165.85 17.027,165.85 cw(c17.027,163.924) 18.388,165.287 cw(c17.027,163.924) 18.389,165.286 22.367,161.308
  Top Layer w1: v2(21.3,148.725) 21.3,159.189 cw(c23.84,159.189) 22.044,160.985 22.367,161.308 ; 22.494,161.435 28.479,164.15 28.481,164.151 cw(c30.023,160.742) 31.035,164.344 36.129,162.909 36.133,162.908 cw(c35.054,159.078) 38.08,161.661 38.835,160.778 39.65,159.825 39.776,159.656 39.964,159.205 ; v2(41.025,152.1) 39.964,159.205 ; v3(44.05,159.7) 40.374,159.375 ccw(c40.374,158.795) 39.964,159.205
  Bottom Layer w0.5: R72.2@9.776,189.125 v2(10.75,189.1) ; R82.2@13.575,179.475 13.848,179.802 13.95,179.925 v2(14.85,179.925) ; v3(44.05,159.7) 44.325,158.325 Q4.2@44.375,157.975
  Bottom Layer w1: C54.1@19.9,131.25 19.9,139.543 cw(c20.327,139.543) C55.1@20.025,139.845 20.025,145.373 cw(c22.565,145.373) 20.769,147.169 ccw(c19.529,148.409) 21.282,148.409 ; R50.2@36.5,150.125 38.656,150.125 cw(c38.656,149.179) 39.325,149.848 39.808,150.331 cw(c41.604,148.535) 41.023,151.008 ; C52.2@40.95,153.3 v2(41.025,152.1) 41.05,151.798 cw(c40.053,151.717) 41.053,151.75 41.066,151.328 cw(c40.066,151.297) 41.023,151.008 ; R47.1@46.7,151.075 41.604,151.075 ccw(c41.604,148.535) 41.023,151.008
12v_force: Ban.1 C83.2 C84.1 D1.1 K1.1 Q4.3 R48.2 R56.2 R63.2 R86.2 | length 226.9
  Int2 (PWR) w1: v3(23.2,153.6) 33.96,154.844 33.962,154.845 ccw(c33.845,155.838) 34.439,155.033 35.275,155.65 35.781,156.156 cw(c37.577,154.36) 37.565,156.9 37.568,156.9 ccw(c37.56,157.9) 37.588,156.9 v3(42.35,157.05) ; v3@42.368,157.056 46.35,156.9 ; v2(45.825,160.475) 46.057,160.243 cw(c45.35,159.536) 46.35,159.536 46.35,157.176 46.35,156.9 ; v3(46.275,93.275) 46.35,151.6 46.35,156.825 46.35,156.845 46.35,156.9 ; 46.55,151.6 56.386,151.6 56.673,151.558 61.456,150.124 ccw(c63.228,156.028) 64.792,150.065 71.992,151.939 71.993,151.939 ccw(c71.09,155.371) 73.942,153.259 v2(75.4,155.225)
  Bottom Layer w1: C84.1@13.775,54.325 13.775,51.964 ccw(c14.775,51.964) 13.975,51.364 ccw(c14.775,51.964) 14.067,51.258 15.983,49.342 ccw(c16.689,50.05) 16.689,49.05 18.313,49.05 K1.1@18.425,49.05 18.696,49.525 ccw(c15.863,50.824) 18.959,50.468 cw(c19.952,50.35) 18.962,50.491 cw(c20.306,50.298) C83.2@19.725,51.525 ccw(c19.562,58.714) 21.99,51.945 ccw(c21.65,52.886) 22.65,52.884 22.65,72.775 ; D1.1@16.4,42.525 17.075,42.825 17.208,42.985 ccw(c16.439,43.624) 17.436,43.546 cw(c25.253,42.95) 18.589,47.08 ccw(c17.738,47.605) 18.737,47.651 18.694,48.575 K1.1@18.44,48.816 ; R86.2@19.75,72.775 22.65,72.775 ; R56.2@21.282,153.602 21.582,153.602 v3(23.2,153.6) ; v3(42.35,157.05) 42.35,155.599 R48.2@42.45,155.599 ; Q4.3@45.325,160.475 v2(45.825,160.475) ; v3(46.275,93.275) 46.276,87.934 cw(c45.276,87.936) 46.275,87.908 ccw(c47.275,87.881) 46.275,87.889 cw(c43.735,87.902) 46.275,87.887 cw(c43.735,87.902) 45.531,86.106 45.119,85.694 cw(c43.323,87.49) 43.323,84.95 33.789,84.95 ccw(c33.789,83.95) 33.189,84.75 ccw(c33.789,83.95) 33.083,84.658 22.942,74.517 ccw(c23.65,73.811) 22.85,74.411 ccw(c23.65,73.811) 22.65,73.811 22.65,72.775 ; v2(75.4,155.225) cw(c88.211,147.961) 77.082,157.606 cw(c77.836,156.949) 77.139,157.667 cw(c79.075,155.666) 79.071,158.45 R63.2@79.075,158.45 ; R63.2@79.078,158.47 ccw(c79.399,160.99) 80.395,158.654 ccw(c79.184,161.494) 81.279,159.226 cw(c81.955,158.489) 81.315,159.257 81.466,159.383 ccw(c80.825,160.151) 81.825,160.148 81.825,165.877 cw(c85.193,165.882) 84.2,169.1 cw(c84.493,168.144) 84.309,169.127 Ban.1@85.25,169.3
18v_hard: C72.2 C73.2 C74.2 D2.2 D4.2 IC19.2 IC19.4 R74.2 | length 89.5
  Int2 (PWR) w1: v2(64.425,147.025) 71.223,147.025 ccw(c71.223,149.565) 73.019,147.769 75.1,149.85 76.649,152.743 ccw(c75.767,153.215) 76.76,153.098 78.125,164.869 cw(c79.118,164.751) 78.259,165.262 cw(c106.038,148.691) 78.26,165.264 cw(c106.038,148.691) 84.07,172.433 98.495,185.838 cw(c99.175,185.105) 99.175,186.105 101.656,186.105 cw(c101.656,185.105) 102.363,185.812 v2(104.2,183.975)
  Bottom Layer w1: C74.2@60.025,155.725 62.038,151.222 ccw(c62.95,151.632) 62.612,150.69 63.075,150.525 IC19.4@64.125,150.15 64.475,149.775 64.475,149.386 cw(c63.475,149.386) 64.475,149.365 v2(64.425,147.025) 64.4,143.85 64.4,143.07 cw(c63.205,143.07) R74.2@64.05,142.225 64.05,141.925 C73.2@64.05,138.9 ; C72.2@61.676,138.75 C73.2@64.05,138.75 ; D4.2@104.025,186.65 104.2,185.975 v2(104.2,183.975) 104.2,182.275 D2.2@104.1,181.6
24v_cher: C70.2 C77.1 C78.1 Q14.2 Q15.2 R77.1 R79.2 Z4.1 Z5.1 | length 57.5
  Top Layer w1: v2(56.675,139.9) 58.968,139.9 59.991,140.324 ccw(c59.609,141.248) 60.313,140.538 63.167,143.392 ; v2(59.2,147.895) cw(c59.231,146.895) 60.027,147.501 63.167,143.392 ; v2(84.05,148.9) v2(76.55,148.9) ccw(c76.55,147.9) 75.894,148.654 74.712,147.626 cw(c74.055,148.381) 74.439,147.457 74.437,147.457 74.099,147.317 cw(c73.717,148.241) 73.72,147.241 69.462,147.24 ccw(c69.468,140.736) 64.625,145.079 ccw(c69.468,140.736) 63.998,144.255 cw(c63.157,144.797) 63.866,144.091 63.706,143.931 cw(c62.998,144.638) 63.704,143.929 63.167,143.392
  Bottom Layer w1: C70.2@56.675,138.75 v2(56.675,139.9) ; R77.1@59.15,152.575 58.983,151.071 ccw(c59.977,150.962) 59.194,150.339 59.665,149.75 Z4.1@59.865,149.5 v2(59.2,147.895) Q14.2@59.2,147.075 ; Q15.2@76.55,150.625 v2(76.55,148.9) ccw(c77.55,148.9) 76.593,148.61 76.725,148.175 R79.2@76.725,147.875 ; Z5.1@81.475,154.215 83.075,154.215 83.41,154.247 83.664,154.021 83.73,153.962 83.74,153.953 cw(c83.075,153.206) 84.075,153.206 84.075,149.12 cw(c83.075,149.122) v2(84.05,148.9) ; C77.1@84.075,145.55 v2@84.075,148.875
24v_cher_fod: C61.2 C68.1 C69.1 Q9.2 Q10.2 R65.1 R68.2 Z2.1 Z3.1 | length 45.2
  Top Layer w1: C69.1@81.675,98.725 81.675,107.89 cw(c81.76,107.89) C68.1@81.7,107.95
  Bottom Layer w1: Q9.2@54.25,102.9 54.471,103.121 ccw(c52.675,104.917) 55.215,104.917 Z2.1@55.215,105.575 55.215,108.393 ccw(c54.993,108.393) R65.1@55.15,108.55 ccw(c55.632,109.032) 55.632,108.35 R68.2@57.7,108.35 59.929,108.35 ccw(c59.929,109.511) Z3.1@60.75,108.69 ccw(c61.631,109.571) 61.631,108.325 Q10.2@64.675,108.325 65.309,108.325 ccw(c65.309,108.666) 65.55,108.425 66.307,109.182 ccw(c66.265,109.225) 66.325,109.225 66.681,109.581 cw(c68.477,107.785) 68.477,110.325 C61.2@81.775,110.325 81.775,108.131 cw(c81.519,108.131) C68.1@81.7,107.95
24v_fod: C66.2 C67.2 IC15.3 Q9.3 | length 11.1
  Bottom Layer w1: IC15.3@46.3,101.7 cw(c45.696,101.096) 46.55,101.096 C66.2@46.55,98.675 C67.2@49.05,98.675 51.787,98.675 ccw(c51.787,100.638) 53.175,99.25 ccw(c52.873,99.552) 53.3,99.552 Q9.3@53.3,100.4
24v_force: C62.2 PS1.4 Q10.3 R4.1 Z7.1 | length 35.4
  Bottom Layer w1: Z7.1@66.7,103.4 66.7,106.228 cw(c68.322,106.228) Q10.3@67.175,107.375 ; Q10.3@67.473,107.375 cw(c67.473,104.835) 69.269,106.631 C62.2@69.6,106.3 cw(c70.022,105.878) 70.022,106.475 PS1.4@72.825,106.475 75.056,104.244 ccw(c76.852,106.04) 76.852,103.5 83.671,103.5 83.675,103.5 cw(c83.673,86.173) 95.918,98.432 R4.1@95.925,98.425
24v_hard: C75.2 C76.2 IC19.3 Q14.3 | length 22.1
  Top Layer w1: v2(57.725,154.25) 57.725,147.026 ccw(c62.676,147.026) v2(59.175,143.525)
  Bottom Layer w1: v2(57.725,154.25) C75.2@57.725,155.439 ; Q14.3@58.25,144.575 59.025,144.575 ; C76.2@59.175,138.75 59.175,144.212 ccw(c58.662,144.212) 59.025,144.575 ; 62.1,144.875 cw(c61.376,145.599) 61.376,144.575 59.025,144.575
24v_test: C71.2 PS2.4 Q15.3 Z6.1 | length 27.9
  Bottom Layer w1: C71.2@69.176,138.75 71.107,138.75 ; Z6.1@70.425,144.2 cw(c68.779,142.554) 71.107,142.554 71.107,138.75 ; Z6.1@70.467,144.271 70.153,144.485 68.853,146.541 cw(c69.445,146.915) 68.745,146.915 68.745,148.485 cw(c69.445,148.485) 69.033,149.051 74.375,152.934 cw(c74.963,152.125) 74.933,153.125 cw(c74.963,152.125) 74.963,153.125 Q15.3@77.5,153.125 ; PS2.4@72.825,134.4 72.825,136.298 ccw(c70.285,136.298) 72.081,138.094 71.65,138.525 ccw(c71.107,137.982) 71.107,138.75
220_L: 220.1 FU1.1 K1.3
220_L_Fuse: C48.1 FL1.1 FU1.2 R43.1 RV1.2 | length 0.6
  Top Layer w1: RV1.2@47.613,29.225 RV1.2@48.225,29.125
220_L_rele: FU2.2 rele220_out.2 | length 41.8
  Top Layer w1: rele220_out.2@8.175,68.325 8.948,68.325 cw(c8.948,65.785) 10.744,67.581 23.706,54.619 cw(c21.91,52.823) 24.45,52.823 FU2.2@24.45,45.075
  Top Layer w2.54: FU2.2@24.45,39.575 FU2.2@24.45,45.075
  Bottom Layer w2.54: FU2.2@24.475,39.454 24.472,39.467 ccw(c22.355,39.575) 24.475,39.575 FU2.2@24.475,44.954
220_N: 220.3 C48.2 FL1.2 R45.1 rele220_out.1 RV1.1 | length 40.6
  Top Layer w1: rele220_out.1@8.175,71.825 11.436,71.825 cw(c11.436,70.825) 12.143,71.532 31.206,52.469 cw(c29.41,50.673) 31.95,50.673 R45.1@31.95,43.025
310v: C1.1 C2.1 C3.1 C4.1 C5.1 C6.1 C7.1 C8.1 C9.1 C10.1 C11.1 C12.1 C13.1 C14.1 D9.1 R33.2 VT1.2 | length 401.9
  Top Layer w1: VT1.2@98.875,153.95 99.706,154.781 cw(c101.502,152.985) 101.502,155.525 126.01,155.525 126.012,155.525 ccw(c126.01,156.525) 126.726,155.828 ccw(c121.701,160.699) 128.7,160.699 C2.1@128.7,167.575
  Top Layer w2.54: C14.1@126.3,186.7 131.948,186.7 cw(c131.948,184.16) 133.744,185.956 C9.1@134.825,184.875 137.431,182.269 ccw(c139.227,184.065) 139.227,181.525 C5.1@151.275,181.525 151.275,167.5 ; C2.1@128.7,167.575 151.094,167.575 ; C7.1@129.075,131.375 151.819,131.375 ccw(c151.819,131.631) 152,131.45 ; C3.1@129.425,94.825 152.304,94.825 cw(c152.304,94.654) 152.425,94.775 ; D9.1@134.75,71.18 149.943,71.18 cw(c149.943,68.64) 151.739,70.436 152.425,69.75 152.425,59.35 ; C4.1@152.425,73.224 152.425,94.775 ; C13.1@153.85,17.275 153.294,17.831 cw(c155.09,19.627) 152.55,19.627 C6.1@152.55,37.124 cw(c152.852,37.426) 152.425,37.426 152.425,59.35 ; C12.1@172.6,59.875 153.692,59.875 ccw(c153.692,58.083) 152.425,59.35 ; C11.1@172.6,96.25 152.546,96.25 ccw(c152.546,96.079) 152.425,96.2 ; C10.1@172.6,168.825 153.396,168.825 ccw(c153.396,166.285) 151.6,168.081 151.094,167.575 ; 151.094,167.575 cw(c151.094,167.319) 151.275,167.5 ; 151.275,167.5 151.275,147.175 ccw(c153.75,147.175) C1.1@152,145.425 152,131.45 ; 152,131.45 152,110.35 ccw(c153.451,110.35) C8.1@152.425,109.324 152.425,96.2 ; 152.425,94.775 152.425,96.2
  Bottom Layer w1: R33.2@115.75,80.5 ccw(c115.712,97.286) 127.818,85.657 ccw(c115.712,97.286) 127.819,85.659 ccw(c120.671,92.496) 130.535,91.763 ccw(c129.538,91.835) 130.468,92.202 130.022,93.325 C3.1@129.425,94.825
  other v2: 122.4,153.575 115.575,153.625 126.375,153.625 127.45,153.95 103.625,154.2 128.1,155.4 126.7,155.55 118.825,155.575 124.725,156.625 126.475,157.075 127.55,157.2 126.525,158.325
Ban_but: Ban.2 R64.1 | length 5.4
  Bottom Layer w1: Ban.2@85.25,165.8 86.923,165.8 ccw(c86.923,168.34) 88.719,166.544 R64.1@89.925,167.75
Ban_CPU: CPU.19 IC16.4 | length 20.3
  Top Layer w0.5: CPU.19@63.08,185.875 67.38,181.575 67.382,181.573 ccw(c69.792,183.983) 69.792,180.575 69.793,180.575 70.398,180.575 cw(c70.398,178.035) 72.158,179.867 72.159,179.865 ccw(c72.504,180.227) 72.263,179.789 v2(77.574,176.883)
  Bottom Layer w0.5: v2(77.574,176.883) 78.295,175.125 IC16.4@78.77,174.325
Check_220_power: CPU.20 Q20.3 R94.1 | length 32.2
  Top Layer w0.5: R94.1@43.925,195.625 cw(c44.891,194.659) 44.891,196.025 v2(45.375,196.025) Q20.3@46.3,196.025
  Int2 (PWR) w0.5: v2(45.375,196.025) 56.073,196.025 cw(c56.073,193.485) 57.869,195.281 64.431,188.719 cw(c61.669,185.957) 65.575,185.957 65.575,184.203 cw(c65.075,184.203) 65.475,183.903 65.294,183.661 cw(c64.893,183.96) 65.15,183.531 cw(c64.435,184.734) 64.435,183.335 CPU.20@63.08,183.335
Check_220_power_to_12v_transform: C31.2 C36.2 IC3.10 IC10.3 R16.1 R19.1 | length 38.9
  Top Layer w0.5: IC10.3@99.975,37.48 100.775,37.95 104.964,37.95 ccw(c104.962,38.45) 105.289,38.072 cw(c106.1,37.139) 106.1,38.375 117.126,38.375 cw(c117.126,35.951) 119.55,35.939 119.891,29.847 ccw(c120.39,29.875) 120.39,29.375 120.975,29.375 C36.2@121.225,29.226 121.225,26.75 cw(c121.2,26.75) R19.1@121.2,26.725 C31.2@121.2,24.85 ; C31.2@121.175,24.225 121.479,24.529 cw(c121.832,24.175) 121.832,24.675 123.368,24.675 ccw(c123.368,25.175) 123.668,24.775 IC3.10@123.75,24.85 125.189,24.85 cw(c125.189,24.825) v2(125.214,24.825)
  Bottom Layer w0.5: v2(125.214,24.825) ccw(c125.214,25.65) R16.1@126.039,25.65
Control_220: CPU.12 IC22.1 | length 48.2
  Top Layer w0.5: v2(23.475,175.225) 23.544,179.059 cw(c24.044,179.05) 24.04,179.55 24.042,179.55 50.673,179.55 ccw(c50.673,182.09) 52.469,180.294 52.525,180.35 ccw(c51.571,181.304) 52.92,181.304 CPU.12@52.92,183.335
  Bottom Layer w0.5: IC22.1@13.58,174.9 ccw(c14.497,174.9) 13.848,174.252 14.65,173.45 ccw(c15.314,174.114) 15.314,173.175 21.445,173.175 ccw(c21.445,174.455) 22.35,173.55 22.588,173.788 ccw(c22.235,174.142) 22.662,173.883 v2(23.475,175.225)
CPU_12v_force_power: CPU.2 IC12.1 | length 9.4
  Bottom Layer w0.5: CPU.2@40.22,183.335 40.22,181.59 ccw(c42.115,181.59) 40.775,180.25 41.751,179.274 cw(c39.955,177.478) 42.495,177.478 IC12.1@42.495,174.725
CPU_fod3184_power: CPU.6 IC17.1 | length 9.4
  Bottom Layer w0.5: CPU.6@45.3,183.335 45.3,181.552 ccw(c47.84,181.552) 46.044,179.756 46.697,179.103 cw(c44.901,177.307) 47.441,177.307 IC17.1@47.441,174.65
CPU_hards_power: CPU.13 IC20.1 | length 11.8
  Bottom Layer w0.35: CPU.13@55.46,185.875 CPU.13@55.956,185.379
  Bottom Layer w0.5: CPU.13@55.956,185.379 cw(c54.16,183.583) 56.7,183.583 56.7,178.16 ccw(c57.81,178.16) 57.025,177.375 cw(c56.286,176.636) 57.331,176.636 IC20.1@57.331,174.625
cpu_switch_vak_1: CPU.14 IC11.4 | length 20.9
  Top Layer w0.5: v2(40.35,177.225) cw(c42.834,174.728) 42.832,178.25 51.473,178.25 ccw(c51.471,178.75) 51.661,178.287 51.662,178.288 53.021,178.85 ccw(c52.83,179.312) 53.184,178.959 54.581,180.356 ccw(c52.46,182.478) 55.46,182.478 CPU.14@55.46,183.335
  Bottom Layer w0.5: IC11.4@40.045,174.825 40.045,176.489 cw(c41.086,176.489) v2(40.35,177.225)
cpu_switch_vak_2: CPU.16 IC13.4 | length 41.9
  Top Layer w0.5: v2(25.25,180.975) 34.123,181.05 ccw(c34.117,181.55) 34.128,181.05 ; 34.129,181.05 cw(c34.141,180.55) 34.141,181.05 v2(51.525,181.05)
  Int2 (PWR) w0.5: v2(51.525,181.05) 56.521,181.05 ccw(c56.521,181.904) 57.125,181.3 57.18,181.355 ccw(c55.2,183.335) CPU.16@58,183.335
  Bottom Layer w0.5: IC13.4@21.02,174.925 21.495,175.725 21.779,176.203 cw(c22.208,175.946) 22.081,176.43 ccw(c21.582,178.355) 23.006,176.966 ccw(c18.109,181.745) 24.849,180.566 cw(c25.341,180.477) 25.178,180.95 v2(25.25,180.975)
Drain_1: C40.1 Q1.5 Q1.6 Q1.7 Q1.8 T1.1 | length 11.6
  Bottom Layer w0.35: T1.1@106.184,12.384 T1.1@105.725,11.925 106.008,11.925 cw(c106.008,10.133) 107.275,11.4 cw(c106.732,10.857) 107.5,10.857 107.5,10.275 107.5,8.875 Q1.5@107.5,7.55
  Bottom Layer w0.5: T1.1@106.184,12.384 cw(c107.98,10.588) 107.98,13.128 C40.1@111.352,13.128
Drain_2: Q2.5 Q2.6 Q2.7 Q2.8 R25.1 T1.5 | length 19.8
  Bottom Layer w0.35: Q2.5@107.775,33.25 Q2.6@107.775,34.585 Q2.7@107.775,35.915 Q2.8@107.775,37.25 ; Q2.8@110.275,35.25 111.281,34.244 cw(c109.485,32.448) 112.025,32.448
  Bottom Layer w0.5: Q2.5@107.925,33.25 ccw(c107.925,30.365) 105.885,32.405 T1.5@105.725,32.245 108.503,32.245 cw(c108.503,29.705) 110.299,31.501 R25.1@112.025,29.775 112.025,32.448
EN_drv: C23.1 IC4.1 IC4.8 IC5.1 Q3.3 R8.1 | length 24.8
  Top Layer w0.35: R8.1@116.475,18.675 116.475,19.474 ; IC4.8@116.575,20.374 ccw(c116.575,20.274) 116.475,20.274 116.475,19.474 ; IC4.1@120.975,20.374 120.975,20 cw(c120.625,20) 120.625,19.65 116.651,19.65 ccw(c116.651,19.474) 116.475,19.474
  Top Layer w0.5: R8.1@116.475,18.675 117.025,18.425 v2(117.35,17.275)
  Int2 (PWR) w0.5: v2(117.35,17.275) 118.507,17.472 ccw(c118.423,17.965) 118.64,17.515 ccw(c117.6,19.65) 118.644,17.517 ccw(c117.6,19.65) 119.975,19.65 v2(119.975,25.625)
  Bottom Layer w0.5: C23.1@116.45,17.249 117,17.275 v2(117.35,17.275) ; v2(119.975,25.625) 119.975,27.025 cw(c120.75,27.025) Q3.3@120.75,27.8 122.518,27.8 ccw(c122.518,28.345) IC5.1@123.063,28.345
Eth: 220.2 Eth1.1
Fod_3184_18v: C42.1 C59.2 C60.2 C63.2 C64.2 C65.2 fod3184_+18v.1 IC14.3 IC15.2 IC15.4 R30.1 R62.2 R89.1 | length 121.3
  Top Layer w1: fod3184_+18v.1@16,108.8 v2(24.925,109.125) ; v2(44.2,98.65) 61.048,98.65 cw(c61.048,96.11) 62.844,97.906 69.406,91.344 cw(c67.61,89.548) 70.15,89.548 R30.1@70.15,87.6 ; R30.1@70.125,87.54 cw(c70.21,87.54) R30.1@70.15,87.6 ; 76.291,87.666 cw(c75.586,88.375) 76.186,87.575 ; 76.292,87.667 77.829,89.204 ccw(c76.933,90.1) C42.1@78.2,90.1 ; R89.1@79,81.45 79,83.709 ccw(c76.46,83.709) 78.256,85.505 76.186,87.575 ; R30.1@70.15,87.6 ccw(c70.782,88.375) 70.78,87.375 75.586,87.375 ccw(c75.586,88.375) 76.186,87.575